# Altium PCB PCB.PcbDoc (part 8 of 8)
Units mm, origin at the board's own origin, x right, y up, seen from the top; angles counter-clockwise.
Board outline 78.8 x 69 mm, 12 copper layers (Top Layer, GND_12, uStrip1, GND_35, Clocks, GND_57, POWER, Slow_Ctrl, GND_810, uStrip2, GND_1012, Bottom Layer), stack 2.926 mm thick; 460 components, 314 nets, 1929 pads, 3409 vias.
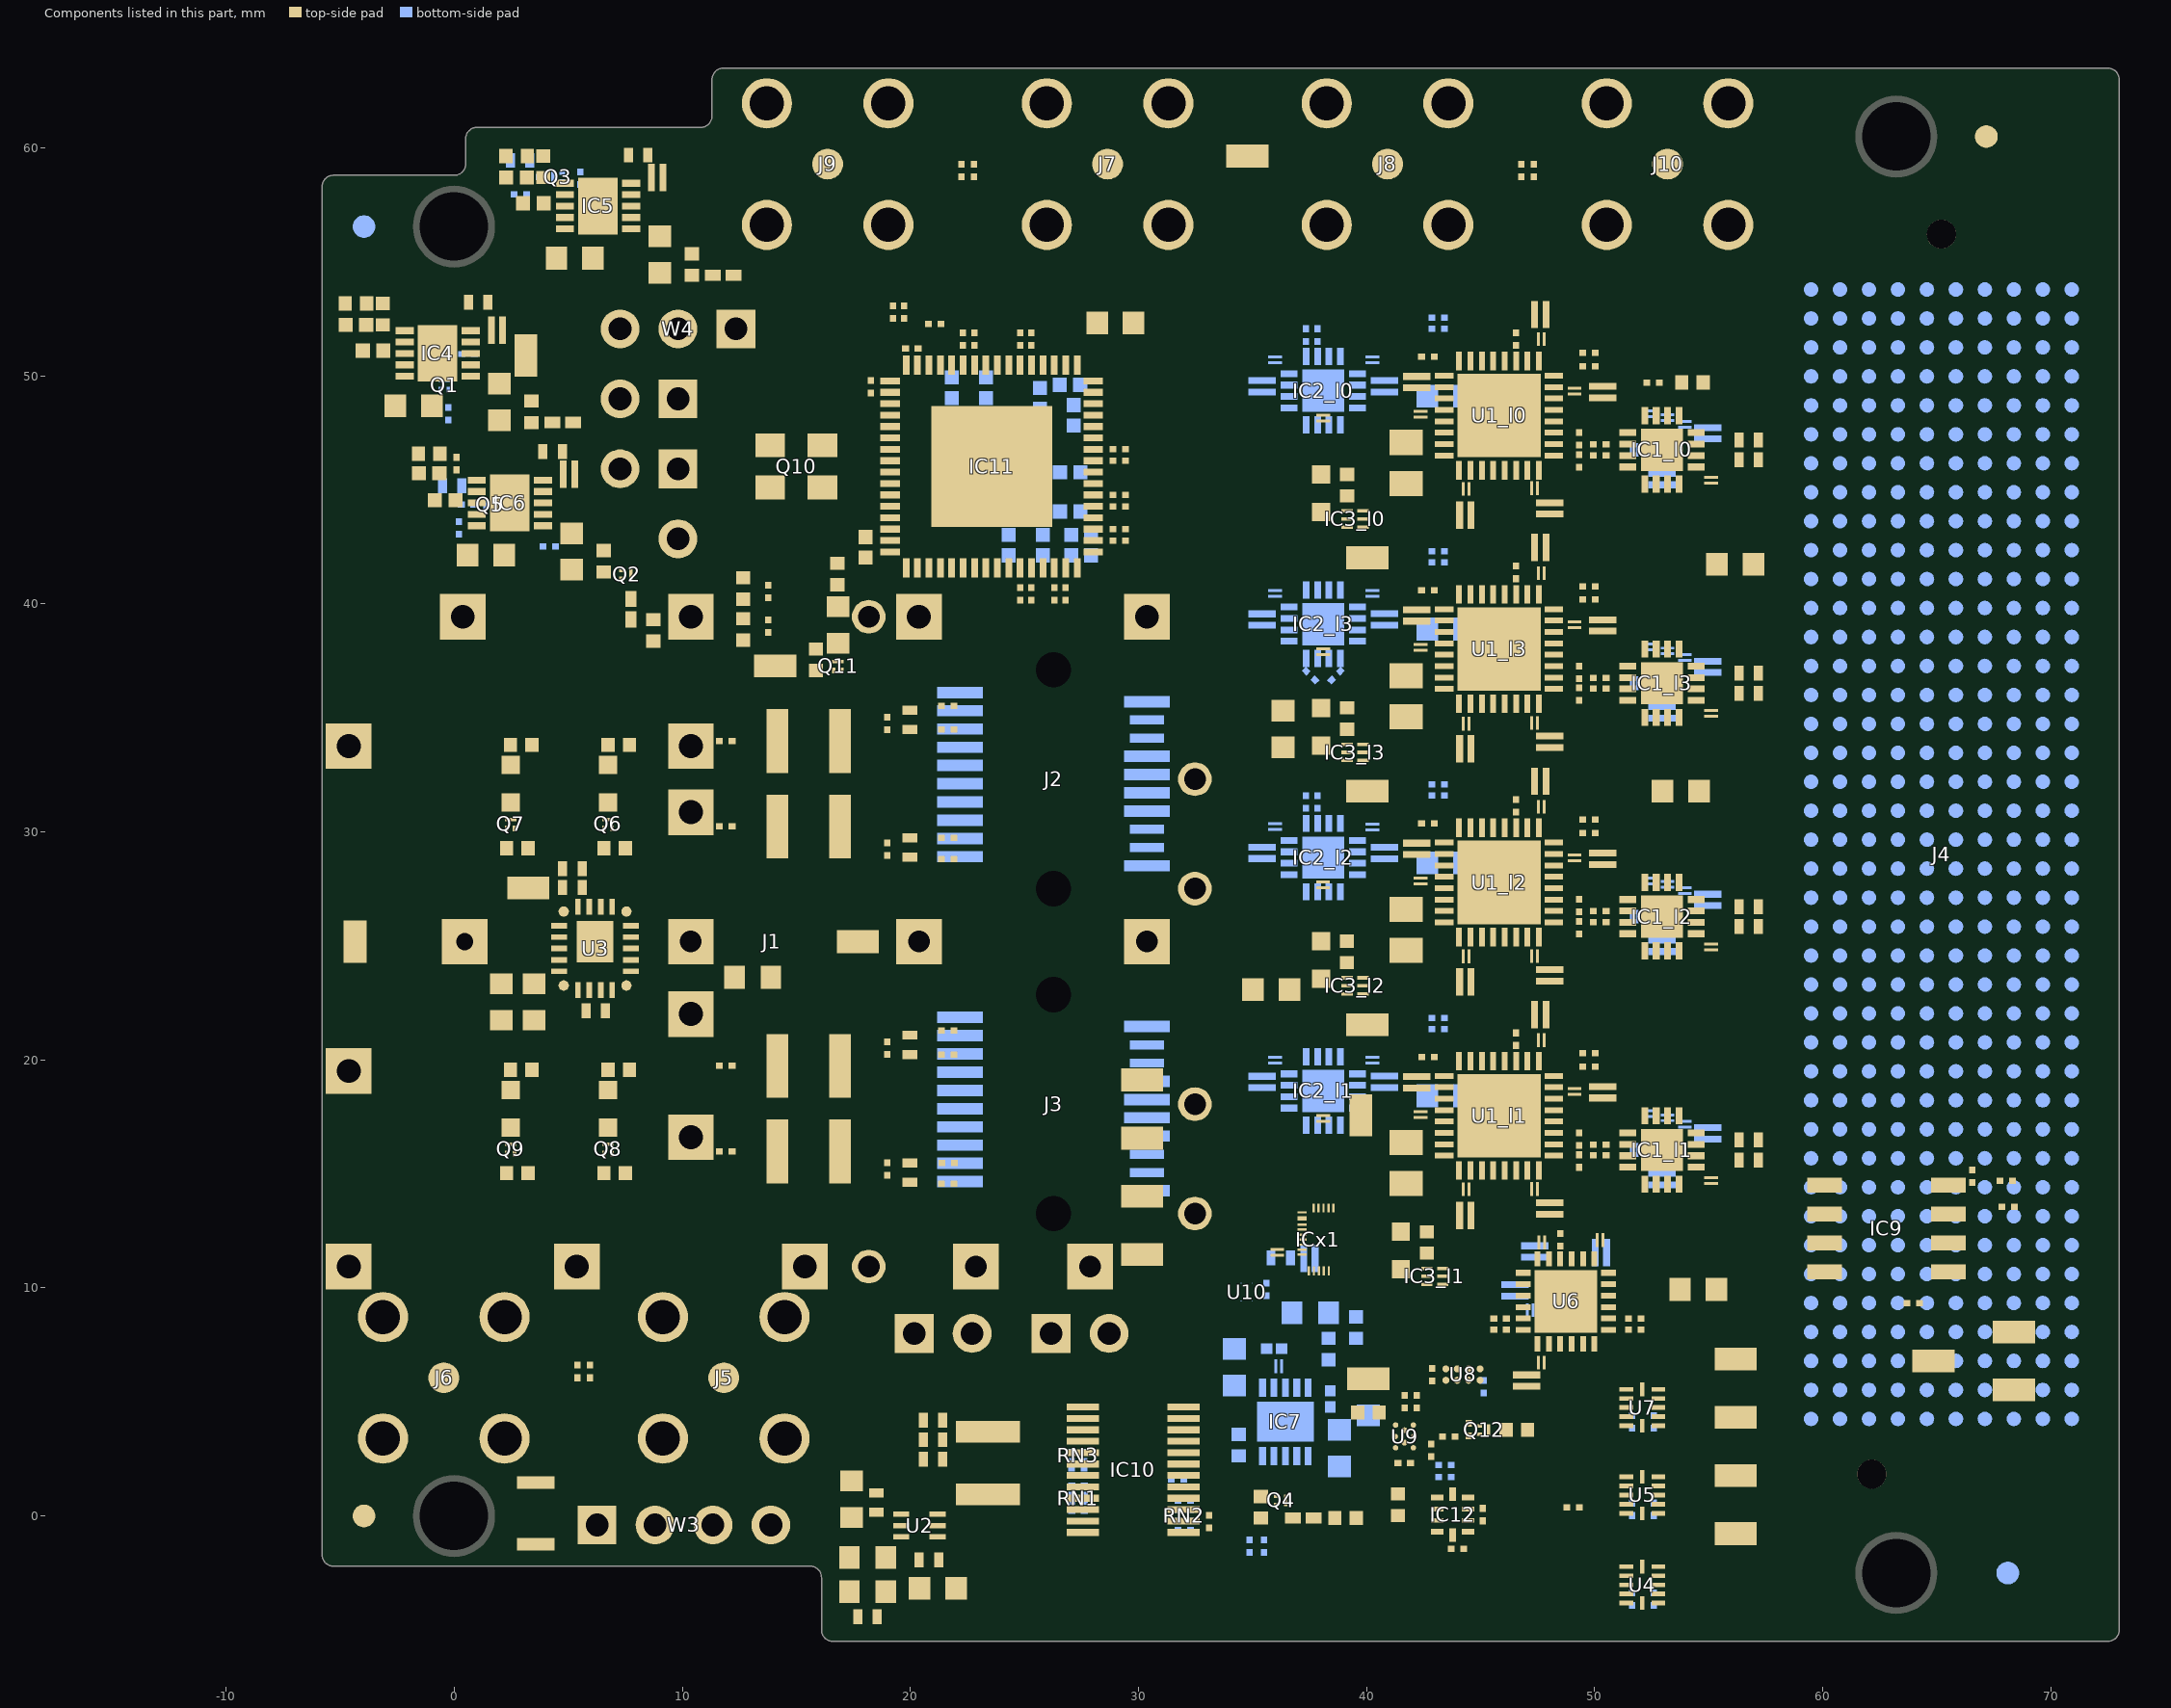
[diagram p17: the components of this part, seen from the top]

## Polygon pours and split planes (outlines as drawn) (continued)
GND on GND_810 (split plane): -5.338,58.8 -5.398,58.794 -5.457,58.776 -5.399,58.8
GND on GND_810 (split plane): 0.191,58.839 0.111,58.815 0.265,58.879
GND on GND_810 (split plane): 0.353,58.947 0.288,58.894 0.406,59.012
GND on GND_810 (split plane): 0.461,59.109 0.421,59.035 0.485,59.189
GND on GND_810 (split plane): 0.506,60.498 0.5,60.438 0.5,60.499 0.524,60.557
GND on GND_810 (split plane): 0.581,60.68 0.552,60.626 0.576,60.683 0.62,60.727
GND on GND_810 (split plane): 0.72,60.819 0.673,60.78 0.717,60.824 0.774,60.848
GND on GND_810 (split plane): 0.902,60.894 0.843,60.876 0.901,60.9 0.962,60.9
GND on GND_810 (split plane): 10.991,60.939 10.911,60.915 11.065,60.979
GND on GND_810 (split plane): 11.153,61.047 11.088,60.994 11.206,61.112
GND on GND_810 (split plane): 11.261,61.209 11.221,61.135 11.285,61.289
GND on GND_810 (split plane): 16.181,-5.28 16.22,-5.327 16.176,-5.283 16.152,-5.226
GND on GND_810 (split plane): 16.32,-5.419 16.374,-5.448 16.317,-5.424 16.273,-5.38
GND on GND_810 (split plane): 16.061,-2.509 16.085,-2.589 16.021,-2.435
GND on GND_810 (split plane): 16.106,-5.098 16.124,-5.157 16.1,-5.099 16.1,-5.038
GND on GND_810 (split plane): 16.502,-5.494 16.562,-5.5 16.501,-5.5 16.443,-5.476
GND on GND_810 (split plane): 72.599,-5.5 72.538,-5.5 72.598,-5.494 72.657,-5.476
GND on GND_810 (split plane): 72.783,-5.424 72.726,-5.448 72.78,-5.419 72.827,-5.38
GND on GND_810 (split plane): 72.924,-5.283 72.88,-5.327 72.919,-5.28 72.948,-5.226
GND on GND_810 (split plane): 73,-5.099 72.976,-5.157 72.994,-5.098 73,-5.038
GND on GND_810 (split plane): 11.306,63.098 11.3,63.038 11.3,63.099 11.324,63.157
GND on GND_810 (split plane): 15.791,-2.239 15.865,-2.279 15.711,-2.215
GND on GND_810 (split plane): 11.381,63.28 11.352,63.226 11.376,63.283 11.42,63.327
GND on GND_810 (split plane): 11.52,63.419 11.473,63.38 11.517,63.424 11.574,63.448
GND on GND_810 (split plane): 11.702,63.494 11.643,63.476 11.701,63.5 11.762,63.5
GND on GND_810 (split plane): 15.953,-2.347 16.006,-2.412 15.888,-2.294
GND on GND_810 (split plane): 73,63.099 73,63.038 72.994,63.098 72.976,63.157
GND on GND_810 (split plane): 72.657,63.476 72.598,63.494 72.538,63.5 72.599,63.5
GND on GND_810 (split plane): 72.924,63.283 72.948,63.226 72.919,63.28 72.88,63.327
GND on GND_810 (split plane): 72.783,63.424 72.827,63.38 72.78,63.419 72.726,63.448
GND on GND_1012 (split plane): -5.794,-1.798 -5.776,-1.857 -5.8,-1.799 -5.8,-1.738
GND on GND_1012 (split plane): -5.719,-1.98 -5.68,-2.027 -5.724,-1.983 -5.748,-1.926
GND on GND_1012 (split plane): -5.794,58.398 -5.8,58.338 -5.8,58.399 -5.776,58.457
GND on GND_1012 (split plane): -5.719,58.58 -5.748,58.526 -5.724,58.583 -5.68,58.627
GND on GND_1012 (split plane): -5.58,-2.119 -5.526,-2.148 -5.583,-2.124 -5.627,-2.08
GND on GND_1012 (split plane): -5.398,-2.194 -5.338,-2.2 -5.399,-2.2 -5.457,-2.176
GND on GND_1012 (split plane): 143 vertices, not listed, extent -5.799,-5.499 72.999,63.499
GND on GND_1012 (split plane): -5.58,58.719 -5.627,58.68 -5.583,58.724 -5.526,58.748
GND on GND_1012 (split plane): -5.338,58.8 -5.398,58.794 -5.457,58.776 -5.399,58.8
GND on GND_1012 (split plane): 0.191,58.839 0.111,58.815 0.265,58.879
GND on GND_1012 (split plane): 0.353,58.947 0.288,58.894 0.406,59.012
GND on GND_1012 (split plane): 0.461,59.109 0.421,59.035 0.485,59.189
GND on GND_1012 (split plane): 0.506,60.498 0.5,60.438 0.5,60.499 0.524,60.557
GND on GND_1012 (split plane): 0.581,60.68 0.552,60.626 0.576,60.683 0.62,60.727
GND on GND_1012 (split plane): 0.72,60.819 0.673,60.78 0.717,60.824 0.774,60.848
GND on GND_1012 (split plane): 0.902,60.894 0.843,60.876 0.901,60.9 0.962,60.9
GND on GND_1012 (split plane): 10.991,60.939 10.911,60.915 11.065,60.979
GND on GND_1012 (split plane): 11.153,61.047 11.088,60.994 11.206,61.112
GND on GND_1012 (split plane): 11.261,61.209 11.221,61.135 11.285,61.289
GND on GND_1012 (split plane): 16.181,-5.28 16.22,-5.327 16.176,-5.283 16.152,-5.226
GND on GND_1012 (split plane): 16.32,-5.419 16.374,-5.448 16.317,-5.424 16.273,-5.38
GND on GND_1012 (split plane): 16.061,-2.509 16.085,-2.589 16.021,-2.435
GND on GND_1012 (split plane): 16.106,-5.098 16.124,-5.157 16.1,-5.099 16.1,-5.038
GND on GND_1012 (split plane): 16.502,-5.494 16.562,-5.5 16.501,-5.5 16.443,-5.476
GND on GND_1012 (split plane): 72.599,-5.5 72.538,-5.5 72.598,-5.494 72.657,-5.476
GND on GND_1012 (split plane): 72.783,-5.424 72.726,-5.448 72.78,-5.419 72.827,-5.38
GND on GND_1012 (split plane): 72.924,-5.283 72.88,-5.327 72.919,-5.28 72.948,-5.226
GND on GND_1012 (split plane): 73,-5.099 72.976,-5.157 72.994,-5.098 73,-5.038
GND on GND_1012 (split plane): 11.306,63.098 11.3,63.038 11.3,63.099 11.324,63.157
GND on GND_1012 (split plane): 15.791,-2.239 15.865,-2.279 15.711,-2.215
GND on GND_1012 (split plane): 11.381,63.28 11.352,63.226 11.376,63.283 11.42,63.327
GND on GND_1012 (split plane): 11.52,63.419 11.473,63.38 11.517,63.424 11.574,63.448
GND on GND_1012 (split plane): 11.702,63.494 11.643,63.476 11.701,63.5 11.762,63.5
GND on GND_1012 (split plane): 15.953,-2.347 16.006,-2.412 15.888,-2.294
GND on GND_1012 (split plane): 73,63.099 73,63.038 72.994,63.098 72.976,63.157
GND on GND_1012 (split plane): 72.657,63.476 72.598,63.494 72.538,63.5 72.599,63.5
GND on GND_1012 (split plane): 72.924,63.283 72.948,63.226 72.919,63.28 72.88,63.327
GND on GND_1012 (split plane): 72.783,63.424 72.827,63.38 72.78,63.419 72.726,63.448

## Keep-outs
Keep-Out Layer:
  lines w0.254: 73.127,-5.001 cw(c72.5,-5) 72.5,-5.627 16.6,-5.627 ; 73.127,-5 73.127,63 ccw(c72.5,63) 73.127,63.001 ccw(c72.5,63) 72.501,63.627 ; -5.927,-1.7 ccw(c-5.3,-1.7) -5.3,-2.327 ; -5.927,-1.7 -5.927,58.3 ; -5.927,-1.7 -5.927,-1.7 ; -5.927,-1.7 -5.927,-1.7 ; -5.927,58.3 cw(c-5.3,58.3) -5.301,58.927 ; -5.927,58.3 -5.927,58.3 ; -5.301,58.927 cw(c-5.3,58.8) -5.3,58.927 ; -5.301,58.927 cw(c-5.3,58.3) -5.3,58.927 ; -5.3,-2.327 14.7,-2.327 15.599,-2.327 ; -5.3,-2.327 -5.3,-2.327 ; -5.3,-2.327 -5.3,-2.327 ; -5.3,58.927 -2,58.927 -0.5,58.927 0,58.927 ; 0,58.927 ccw(c0,59.3) 0.373,59.3 ; 0,58.927 ccw(c0,59.3) 0,58.927 ; 0,58.927 ccw(c0,58.8) 0,58.927 ; 0,58.927 ccw(c0,58.8) 0,58.927 ; 0,58.927 0,58.927 ; 0.373,59.3 cw(c0.5,59.3) 0.373,59.301 ; 0.373,59.3 ccw(c0,59.3) 0.373,59.3 ; 0.373,59.3 0.373,59.301 ; 0.373,59.301 0.373,60.4 ; 0.373,60.4 cw(c1,60.4) 0.999,61.027 ; 0.373,60.4 0.373,60.4 ; 1,61.027 ccw(c1,60.9) 1,61.027 ; 1,61.027 ccw(c1,60.9) 0.999,61.027 ; 1,61.027 ccw(c1,60.4) 0.999,61.027 ; 1,61.027 8,61.027 10.4,61.027 10.8,61.027 ; 10.8,61.027 ccw(c10.8,61.4) 11.173,61.4 ; 10.8,61.027 ccw(c10.8,61.4) 10.8,61.027 ; 10.8,61.027 ccw(c10.8,60.9) 10.8,61.027 ; 10.8,61.027 ccw(c10.8,60.9) 10.8,61.027 ; 10.8,61.027 10.8,61.027 ; 11.173,61.401 ccw(c11.3,61.4) 11.173,61.4 ; 11.173,61.4 ccw(c10.8,61.4) 11.173,61.4 ; 11.173,61.401 11.173,63 cw(c11.8,63) 11.799,63.627 ; 11.173,61.4 11.173,61.401 ; 11.8,63.627 ccw(c11.8,63.5) 11.8,63.627 ; 11.8,63.627 ccw(c11.8,63.5) 11.799,63.627 ; 11.8,63.627 ccw(c11.8,63) 11.799,63.627 ; 11.8,63.627 72.5,63.627 ; 15.599,-2.327 ccw(c15.6,-2.2) 15.6,-2.327 ; 15.599,-2.327 15.6,-2.327 ; 15.6,-2.327 cw(c15.6,-2.7) 15.973,-2.7 ; 15.973,-2.701 cw(c16.1,-2.7) 15.973,-2.7 ; 15.973,-2.701 15.973,-2.7 ; 15.973,-2.701 15.973,-5 ccw(c16.6,-5) 16.6,-5.627 ; 15.973,-2.7 ccw(c15.6,-2.7) 15.973,-2.7 ; 16.6,-5.627 ccw(c16.6,-5.5) 16.6,-5.627 ; 16.6,-5.627 ccw(c16.6,-5.5) 16.6,-5.627 ; 16.6,-5.627 ccw(c16.6,-5.5) 16.6,-5.627 ; 16.6,-5.627 ccw(c16.6,-5.5) 16.6,-5.627 ; 16.6,-5.627 16.6,-5.627 ; 16.6,-5.627 16.6,-5.627 ; 72.501,63.627 ccw(c72.5,63) 72.5,63.627

## Other copper
Top Layer:
  rectangle net VREFAC: 52.668,49.402 54.074,50.022
  rectangle net GND: 38.294,10.557 38.56,11.157
  region net GND: 37.721,13.707 37.472,13.707 37.472,13.205 37.721,13.205
  rectangle net GND: 38.497,13.205 38.763,13.707
  region net NetC143_2: 50.179,12.399 49.729,12.399 49.729,11.695 50.179,11.695
  rectangle net 1VPSF: 35.776,9.929 37.287,11.516
  region net NetC31_l1_2: 37.859,17.373 37.859,16.829 38.359,16.829 38.359,17.373
  region net NetC31_l2_2: 37.85,27.61 37.85,27.066 38.35,27.066 38.35,27.61
  region net NetC31_l3_2: 37.859,37.846 37.859,37.302 38.359,37.302 38.359,37.846
  region net NetC31_l0_2: 37.859,48.081 37.859,47.538 38.359,47.538 38.359,48.081
  region net 3V3CDR: 50.981,12.399 50.306,12.399 50.306,11.248 50.981,11.248
  region net 3V3CDR: 47.205,9.792 46.545,9.792 46.545,9.038 47.205,9.038
  rectangle net XTAL_GND: 18.333,46.78 18.582,47.032
  pour cut-out: 63.132,14.041 63.109,14.168 64.324,14.168 64.301,14.041
  pour cut-out: 2.97,29.699 2.398,29.699 2.431,29.572 2.943,29.572
  pour cut-out: 3.145,34.231 2.573,34.231 2.606,34.104 3.118,34.104
  pour cut-out: 7.417,34.231 6.845,34.231 6.879,34.104 7.391,34.104
  pour cut-out: 15.546,36.936 14.974,36.936 15.007,36.809 15.519,36.809
  pour cut-out: 12.18,52.09 12.18,51.775 12.307,51.809 12.307,52.063
  pour cut-out: 8.249,59.566 7.935,59.566 7.968,59.439 8.222,59.439
  pour cut-out: 3.277,58.292 3.277,57.977 3.404,58.011 3.404,58.265
  pour cut-out: 1.229,53.116 0.915,53.116 0.949,52.989 1.203,52.989
  pour cut-out: -3.755,51.83 -3.755,51.515 -3.628,51.549 -3.628,51.803
  pour cut-out: -0.59,45.273 -0.59,44.959 -0.463,44.993 -0.463,45.247
  pour cut-out: 4.481,46.607 4.167,46.607 4.2,46.48 4.454,46.48
  pour cut-out: 8.313,39.071 8.313,38.757 8.44,38.791 8.44,39.045
  pour cut-out: 14.225,39.622 14.225,39.937 14.098,39.903 14.098,39.649
  pour cut-out: 39.199,5.181 39.072,5.158 39.072,5.458 39.199,5.435
  pour cut-out: 68.082,12.619 68.209,12.642 68.209,12.172 68.082,12.195
  pour cut-out: 64.766,11.007 64.639,10.984 64.639,11.284 64.766,11.261
  pour cut-out: 50.972,-4.572 50.845,-4.595 50.845,-4.295 50.972,-4.318
  pour cut-out: 53.231,2.748 53.254,2.621 52.713,2.621 52.736,2.748
  pour cut-out: 54.351,-0.552 54.374,-0.679 54.074,-0.679 54.097,-0.552
  pour cut-out: 53.692,-1.941 53.669,-1.814 55.993,-1.814 55.97,-1.941
  pour cut-out: 50.229,2.126 50.206,2.253 50.506,2.253 50.483,2.126
  pour cut-out: 49.482,-1.793 49.459,-1.666 49.759,-1.666 49.736,-1.793
  pour cut-out: 42.202,2.248 42.075,2.162 42.075,2.462 42.202,2.375
  region net NetC37_2: 0.318,51.337 1.771,51.337 1.771,53.55 1.271,53.55 1.271,52.9 1.471,52.9 1.471,51.637 0.318,51.637
  pour cut-out: 38.508,44.399 38.485,44.526 38.785,44.526 38.762,44.399
  pour cut-out: 38.508,34.162 38.485,34.289 38.785,34.289 38.762,34.162
  pour cut-out: 38.505,23.926 38.482,24.053 38.782,24.053 38.759,23.926
  pour cut-out: 41.627,11.341 41.65,11.214 41.35,11.214 41.373,11.341
  pour cut-out: 41.373,10.287 41.35,10.414 41.65,10.414 41.627,10.287
  pour cut-out: 36.185,34.186 36.499,34.186 36.465,34.313 36.211,34.313
  pour cut-out: 36.495,33.236 36.181,33.236 36.215,33.109 36.469,33.109
  pour cut-out: 36.139,22.938 36.139,23.252 36.012,23.218 36.012,22.964
  pour cut-out: 37.089,23.249 37.089,22.934 37.216,22.968 37.216,23.222
  pour cut-out: 54.868,9.783 54.868,10.097 54.741,10.063 54.741,9.809
  pour cut-out: 55.818,10.094 55.818,9.779 55.945,9.813 55.945,10.067
  pour cut-out: 54.093,31.633 54.093,31.947 53.966,31.913 53.966,31.659
  pour cut-out: 55.043,31.943 55.043,31.629 55.17,31.663 55.17,31.917
  pour cut-out: 56.492,41.587 56.492,41.902 56.365,41.868 56.365,41.614
  pour cut-out: 57.442,41.898 57.442,41.584 57.569,41.618 57.569,41.872
  pour cut-out: 30.258,52.482 30.258,52.167 30.385,52.201 30.385,52.455
  pour cut-out: 29.308,52.171 29.308,52.485 29.181,52.452 29.181,52.198
  pour cut-out: 18.345,-2.429 18.345,-2.787 18.756,-2.826 18.756,-2.445
  pour cut-out: 18.345,-3.07 18.345,-1.305 17.924,-1.409 17.924,-3.001
  region net P3V6: 18.347,-4.097 18.472,-2.826 19.372,-2.826 19.372,-3.826 18.747,-4.747 18.347,-4.747
  region net NetC48_1: 19.95,-0.805 19.239,-0.805 16.872,-0.805 16.872,-1.325 16.872,-3.826 17.497,-4.747 17.897,-4.747 17.897,-4.097 17.772,-3.826 17.772,-2.325 17.772,-1.325 19.239,-1.034 19.95,-1.034
  pour cut-out: 41.041,23.426 40.914,23.403 40.914,24.144 41.041,24.121
  pour cut-out: 41.037,33.722 40.91,33.699 40.91,34.441 41.037,34.418
  pour cut-out: 41.037,43.914 40.91,43.891 40.91,44.633 41.037,44.61
  pour cut-out: 42.356,11.701 42.229,11.678 42.229,12.157 42.356,12.134
  pour cut-out: 41.036,25.426 40.909,25.403 40.909,25.883 41.036,25.86
  pour cut-out: 41.036,35.663 40.909,35.64 40.909,36.119 41.036,36.096
  pour cut-out: 43.227,14.051 43.25,13.924 42.533,13.924 42.556,14.051
  pour cut-out: 41.036,15.323 40.909,15.3 40.909,15.6 41.036,15.577
  pour cut-out: 41.036,45.959 40.909,45.936 40.909,46.416 41.036,46.393
  pour cut-out: 42.768,19.825 42.895,19.848 42.895,19.548 42.768,19.571
  pour cut-out: 40.288,4.251 40.311,4.124 40.011,4.124 40.034,4.251
  pour cut-out: 42.708,2.328 42.685,2.455 42.985,2.455 42.962,2.328
  pour cut-out: 46.297,21.302 46.424,21.325 46.424,21.025 46.297,21.048
  pour cut-out: 42.147,20.247 42.274,20.27 42.274,19.97 42.147,19.993
  pour cut-out: 42.551,20.384 42.574,20.257 42.274,20.257 42.297,20.384
  pour cut-out: 46.285,31.551 46.412,31.574 46.412,31.274 46.285,31.297
  pour cut-out: 42.135,30.496 42.262,30.519 42.262,30.219 42.135,30.242
  pour cut-out: 42.539,30.633 42.562,30.506 42.262,30.506 42.285,30.633
  pour cut-out: 46.285,41.787 46.412,41.81 46.412,41.51 46.285,41.533
  pour cut-out: 42.135,40.732 42.262,40.755 42.262,40.455 42.135,40.478
  pour cut-out: 42.539,40.869 42.562,40.742 42.262,40.742 42.285,40.869
  pour cut-out: 42.539,51.106 42.562,50.979 42.262,50.979 42.285,51.106
  pour cut-out: 42.135,50.968 42.262,50.991 42.262,50.691 42.135,50.714
  pour cut-out: 46.285,52.023 46.412,52.046 46.412,51.746 46.285,51.769
  pour cut-out: 37.476,44.155 37.603,44.178 37.603,43.878 37.476,43.901
  pour cut-out: 37.476,33.919 37.603,33.942 37.603,33.642 37.476,33.665
  pour cut-out: 37.473,23.682 37.6,23.705 37.6,23.405 37.473,23.428
  pour cut-out: 40.973,10.941 41.1,10.964 41.1,10.664 40.973,10.687
  pour cut-out: 18.934,0.435 18.934,0.793 18.743,0.536
  pour cut-out: 20.975,-2.619 20.975,-2.261 20.554,-2.364 20.554,-2.549
  region net NetR71_1: 12.168,38.163 12.665,38.163 12.665,38.663 12.168,38.663
  region net NetR70_1: 12.168,40.903 12.665,40.903 12.665,41.403 12.168,41.403
  region net VccT0: 7.93,32.723 7.93,33.903 7.43,33.903 7.43,32.723
  region net SFP0_FAULT: 7.255,29.785 7.255,29.204 7.755,29.204 7.755,29.785
  region net VccR0: 3.657,33.322 3.657,33.903 3.157,33.903 3.157,33.322
  region net SFP0_LOS: 2.982,29.785 2.982,29.204 3.482,29.204 3.482,29.785
  region net 3V3APLL: 18.432,43.348 18.714,43.63 19.533,43.63 19.533,43.93 18.218,43.93 17.722,43.434 17.722,42.62 18.432,42.62
  region net CDR_LOL_0: 43.497,46.266 43.497,46.636 42.997,46.636 42.997,46.266
  region net NetC49_2: 2.847,59.012 4.227,59.012 4.227,58.392 4.492,58.099 5.251,58.099 5.251,57.799 4.451,57.799 3.917,58.392 2.847,58.392
  region net NetC59_2: 3.484,44.78 4.936,44.78 4.936,46.994 4.625,46.994 4.625,45.08 3.484,45.08
  region net CDR_LOL_1: 43.497,15.557 43.497,15.927 42.997,15.927 42.997,15.557
  region net CDR_LOL_3: 43.497,36.03 43.497,36.4 42.997,36.4 42.997,36.03
  region net CDR_LOL_2: 43.497,25.793 43.497,26.163 42.997,26.163 42.997,25.793
  region net NetC36_2: -4.186,52.55 -2.806,52.55 -2.806,51.93 -2.54,51.637 -1.782,51.637 -1.782,51.337 -2.582,51.337 -3.116,51.93 -4.186,51.93
  region net NetC58_2: -0.962,46.074 0.36,46.074 0.36,45.374 0.625,45.08 1.384,45.08 1.384,44.78 0.584,44.78 0.05,45.374 -0.962,45.374
  region net NetC41_2: 19.95,-0.034 18.182,-0.034 18.182,0.365 19.241,0.365 19.95,0.195
  region net 3V3CDR_EN: 7.501,58.845 7.501,58.299 8.001,58.299 8.001,58.845
  region net PLL_Lock: 15.362,37.771 15.86,37.771 15.86,38.271 15.362,38.271
  region net XTAL_GND: 18.433,44.88 18.183,45.13 18.483,45.43 19.533,45.43 19.533,45.13 18.683,45.13
  region net XTAL_GND: 18.433,47.18 18.183,46.93 18.483,46.63 19.533,46.63 19.533,46.93 18.683,46.93
  region net NetC50_2: 7.338,57.799 8.79,57.799 8.79,60.012 8.29,60.012 8.29,59.362 8.49,59.362 8.49,58.099 7.338,58.099
  region net VccT1: 7.93,18.473 7.93,19.653 7.43,19.653 7.43,18.473
  region net VccR1: 3.657,19.072 3.657,19.653 3.157,19.653 3.157,19.072
  region net SFP1_LOS: 2.982,15.535 2.982,14.954 3.482,14.954 3.482,15.535
  region net SFP1_FAULT: 7.255,15.535 7.255,14.954 7.755,14.954 7.755,15.535
  region net NetIC5_6: 2.867,59.952 4.451,59.952 5.251,59.332 5.251,58.299 4.451,58.299 4.451,59.332 2.867,59.332
  region net P3V6: 5.251,57.099 5.251,55.799 4.317,55.799 4.317,57.099
  region net NetIC6_6: -1,46.934 0.584,46.934 1.384,46.314 1.384,45.28 0.584,45.28 0.584,46.234 -1,46.234
  region net 1V8_EN: 3.634,45.827 3.634,45.28 4.134,45.28 4.134,45.827
  region net P2V05: 1.384,44.08 1.384,42.78 0.45,42.78 0.45,44.08
  region net P3V6: -1.782,50.637 -1.782,49.337 -2.715,49.337 -2.715,50.637
  region net 3V3APLL_EN: 0.468,52.383 0.468,51.837 0.968,51.837 0.968,52.383
  region net NetIC4_6: -4.166,53.49 -2.582,53.49 -1.782,52.87 -1.782,51.837 -2.582,51.837 -2.582,52.87 -4.166,52.87
uStrip1:
  pour cut-out: -0.461,5.062 cw(c-0.461,6.062) -1.461,6.062 cw(c-0.461,6.062) -0.461,7.062 cw(c-0.461,6.062) 0.539,6.062 cw(c-0.461,6.062)
  pour cut-out: 11.814,5.062 cw(c11.814,6.062) 10.814,6.062 cw(c11.814,6.062) 11.814,7.062 cw(c11.814,6.062) 12.814,6.062 cw(c11.814,6.062)
  pour cut-out: 16.37,58.289 cw(c16.37,59.289) 15.37,59.289 cw(c16.37,59.289) 16.37,60.289 cw(c16.37,59.289) 17.37,59.289 cw(c16.37,59.289)
  pour cut-out: 28.645,58.289 cw(c28.645,59.289) 27.645,59.289 cw(c28.645,59.289) 28.645,60.289 cw(c28.645,59.289) 29.645,59.289 cw(c28.645,59.289)
  pour cut-out: 40.92,58.289 cw(c40.92,59.289) 39.92,59.289 cw(c40.92,59.289) 40.92,60.289 cw(c40.92,59.289) 41.92,59.289 cw(c40.92,59.289)
  pour cut-out: 53.195,58.289 cw(c53.195,59.289) 52.195,59.289 cw(c53.195,59.289) 53.195,60.289 cw(c53.195,59.289) 54.195,59.289 cw(c53.195,59.289)
  pour cut-out: 42.79,5.454 42.79,4.455 44.673,4.455
  pour cut-out: 43.543,3.22 42.862,3.22 42.63,2.064
  pour cut-out: 48.067,5.405 48.067,6.086 47.573,6.086
  pour cut-out: 31.451,10.616 31.428,10.743 32.023,10.743 32,10.616
  pour cut-out: 20.296,47.123 18.546,48.872 12.614,48.872 11.673,47.931 11.673,43.869 13.094,42.454 18.09,42.454 20.296,44.66
  pour cut-out: 20.296,47.123 18.546,48.872 12.614,48.872 11.673,47.931 11.673,43.869 13.094,42.454 18.09,42.454 20.296,44.66
Clocks:
  pour cut-out: 31.958,10.334 31.433,10.39 31.433,10.61
  pour cut-out: 28.277,3.057 27.876,3.057 27.876,3.277
  pour cut-out: 34.105,14.879 35.024,10.598 38.914,12.813
  pour cut-out: 20.296,47.123 18.546,48.872 12.614,48.872 11.673,47.931 11.673,43.869 13.094,42.454 18.09,42.454 20.296,44.66
Slow_Ctrl:
  pour cut-out: 29.829,6.469 27.89,6.469 27.89,6.172 29.829,6.172
  pour cut-out: 22.245,12.746 21.161,12.746 21.161,14.074
  pour cut-out: 23.233,16.434 22.533,16.434 22.533,17.291
  pour cut-out: 7.359,15.834 7.359,16.322 7.957,16.322
  pour cut-out: 20.9,18.125 20.9,17.637 20.302,17.637
  pour cut-out: 65.884,20.176 65.884,18.52 66.181,18.52 66.181,20.176
  pour cut-out: 27.54,7.62 27.54,7.131 26.942,7.131
  pour cut-out: 1.005,37.565 1.493,37.565 1.493,36.666
  pour cut-out: 4.113,41.69 4.113,42.178 5.012,42.178
  pour cut-out: 6.766,30.52 7.255,30.52 7.255,29.921
  pour cut-out: 32.092,10.886 31.553,10.886 31.553,10.589 32.092,10.589
  pour cut-out: 63.696,43.56 64.236,43.56 64.236,43.857 63.696,43.857
  pour cut-out: 66.962,40.71 66.962,40.171 67.259,40.171 67.259,40.71
  pour cut-out: 20.296,47.123 18.546,48.872 12.614,48.872 11.673,47.931 11.673,43.869 13.094,42.454 18.09,42.454 20.296,44.66
uStrip2:
  pour cut-out: 67.902,28.908 67.902,27.962 67.362,27.962
  pour cut-out: 62.407,26.838 63.353,26.838 63.353,24.924
  pour cut-out: 55.276,-2.122 53.442,-2.122 53.442,-1.582
  pour cut-out: 24.297,31.138 24.297,32.084 24.837,32.084
  pour cut-out: 50.709,8.942 51.655,8.942 51.655,8.401
  pour cut-out: 17.217,3.93 17.217,4.876 17.758,4.876
  pour cut-out: 42.691,6.494 42.691,7.44 43.231,7.44
  pour cut-out: 24.275,8.935 25.221,8.935 25.221,8.395
  pour cut-out: 57.749,9.982 58.695,9.982 58.695,9.442
  pour cut-out: 59.307,9.906 58.361,9.906 58.361,10.446
  pour cut-out: 64.104,10.178 65.05,10.178 65.05,9.638
  pour cut-out: 63.829,8.789 64.776,8.789 64.776,8.249
  pour cut-out: 59.591,21.356 58.992,21.424 71.375,21.424 71.375,18.927
  pour cut-out: 64.245,22.386 66.328,22.386 66.328,21.197
  pour cut-out: 68.457,28.653 69.403,28.653 69.403,28.112
  pour cut-out: 71.276,33.733 72.222,33.733 72.222,33.193
  pour cut-out: 71.188,33.325 71.188,32.379 70.648,32.379
  pour cut-out: 64.794,26.668 64.794,27.614 65.335,27.614
  pour cut-out: 63.233,23.529 64.179,23.529 64.179,22.988
  pour cut-out: 63.61,28.27 63.61,27.324 63.07,27.324
  pour cut-out: 52.54,4.839 55.875,4.839 55.875,-2.716
  pour cut-out: 36.202,30.727 37.321,30.559 37.148,30.186
  pour cut-out: 44.427,24.972 45.245,24.972 45.245,24.432
  pour cut-out: 20.372,47.288 18.623,49.037 12.69,49.037 11.749,48.096 11.749,44.034 13.171,42.619 18.166,42.619 20.372,44.825
Bottom Layer:
  rectangle net 3V3CDR: 41.577,17.842 43.145,18.928
  rectangle net 3V3CDR: 41.577,28.064 43.145,29.149
  rectangle net 3V3CDR: 41.577,38.314 43.145,39.399
  rectangle net GND: 38.633,3.301 39.85,4.25
  rectangle net GND: 38.408,4.112 38.633,5.038
  rectangle net 3V3CDR: 41.577,48.523 43.145,49.609
  region net 3V3CDR: 47.118,9.789 45.911,9.789 45.911,8.728 47.118,8.728
  pour cut-out: 6.045,59.57 6.045,59.259 5.809,59.259
  pour cut-out: 56.638,14.342 58.057,14.342 58.057,13.951
  pour cut-out: 26.876,43.434 26.749,43.411 26.749,43.711 26.876,43.688
  region net 3V3_CDR_DIS: 5.38,59.102 5.38,58.8 5.834,58.8 5.834,59.102
  pour cut-out: 31.007,2.515 30.88,2.492 30.88,3.542 31.007,3.519
  pour cut-out: 30.93,1.02 30.803,0.997 30.803,1.297 30.93,1.274
  pour cut-out: 45.331,45.337 45.204,45.314 45.204,46.119 45.331,46.096
  pour cut-out: 34.77,-0.236 34.793,-0.363 33.728,-0.363 33.751,-0.236
  pour cut-out: 39.819,8.467 39.946,8.49 39.946,8.063 39.819,8.086
  pour cut-out: -0.527,48.195 -0.4,48.218 -0.4,47.918 -0.527,47.941
  pour cut-out: 58.117,34.384 58.117,34.25 59.494,34.25
  pour cut-out: 5.39,58.125 5.367,58.252 5.667,58.252 5.644,58.125
  pour cut-out: 2.132,59.58 2.259,59.603 2.259,59.303 2.132,59.326
  pour cut-out: 2.786,59.326 2.659,59.303 2.659,59.603 2.786,59.58
  pour cut-out: 0.75,50.697 0.727,50.824 1.027,50.824 1.004,50.697
  pour cut-out: 1.004,51.225 1.027,51.098 0.727,51.098 0.75,51.225
  pour cut-out: -0.851,45.305 -0.724,45.328 -0.724,45.028 -0.851,45.051
  pour cut-out: 4.723,42.392 4.596,42.369 4.596,42.669 4.723,42.646
  pour cut-out: 34.265,3.157 34.242,3.284 34.542,3.284 34.519,3.157
  pour cut-out: 51.39,-3.316 51.263,-3.339 51.263,-2.234 51.39,-2.257
  pour cut-out: 52.806,-3.619 52.783,-3.492 53.083,-3.492 53.06,-3.619
  pour cut-out: 35.489,12.022 35.616,12.045 35.616,11.745 35.489,11.768
  pour cut-out: 36.098,9.871 36.121,9.744 35.821,9.744 35.844,9.871
  pour cut-out: 35.129,5.259 35.152,5.132 34.852,5.132 34.875,5.259
  pour cut-out: 51.76,4.684 51.783,4.557 51.483,4.557 51.506,4.684
  pour cut-out: 52.711,0.845 52.734,0.718 52.434,0.718 52.457,0.845
  pour cut-out: 51.242,0.718 51.219,0.845 51.519,0.845 51.496,0.718
  region net 1VPSF: 37.391,11.904 36.195,11.904 36.195,9.786 37.391,9.786 37.391,10.704
  pour cut-out: 20.296,47.123 18.546,48.872 12.614,48.872 11.673,47.931 11.673,43.869 13.094,42.454 18.09,42.454 20.296,44.66
GND_12 (plane layer: these items are gaps in the copper):
  region: 53.195,58.289 cw(c53.195,59.289) 52.195,59.289 cw(c53.195,59.289) 53.195,60.289 cw(c53.195,59.289) 54.195,59.289 cw(c53.195,59.289)
  region: 40.92,58.289 cw(c40.92,59.289) 39.92,59.289 cw(c40.92,59.289) 40.92,60.289 cw(c40.92,59.289) 41.92,59.289 cw(c40.92,59.289)
  region: 28.645,58.289 cw(c28.645,59.289) 27.645,59.289 cw(c28.645,59.289) 28.645,60.289 cw(c28.645,59.289) 29.645,59.289 cw(c28.645,59.289)
  region: 16.37,58.289 cw(c16.37,59.289) 15.37,59.289 cw(c16.37,59.289) 16.37,60.289 cw(c16.37,59.289) 17.37,59.289 cw(c16.37,59.289)
  region: 11.814,5.062 cw(c11.814,6.062) 10.814,6.062 cw(c11.814,6.062) 11.814,7.062 cw(c11.814,6.062) 12.814,6.062 cw(c11.814,6.062)
  region: -0.461,5.062 cw(c-0.461,6.062) -1.461,6.062 cw(c-0.461,6.062) -0.461,7.062 cw(c-0.461,6.062) 0.539,6.062 cw(c-0.461,6.062)
  lines w0.762: 11.931,44.118 11.931,47.978 12.667,48.714 18.457,48.714 20.044,47.127 20.044,44.803 18.051,42.81 13.238,42.81 11.931,44.118
POWER (plane layer: these items are gaps in the copper):
  region: 11.673,42.673 17.077,42.673 18.398,43.994 20.296,44.011 20.296,48.832 11.673,48.832
  lines w0.254: -1.959,44.011 1.564,44.011 7.4,35.681 ; -1.956,50.755 -1.959,44.012 -1.959,37.571 1.149,34.95 ; -1.936,50.755 2.085,53.928 3.631,53.928 3.631,60.9 ; 1.145,34.953 1.145,26.552 4.704,26.552 7.4,26.552 7.4,35.681 ; 4.736,26.552 4.736,6.679 24.782,6.679 24.782,0.412 ; 11.673,43.873 11.673,47.931 ; 11.673,48.832 11.673,42.673 16.489,42.673 ; 12.614,48.872 18.546,48.872 ; 19.646,17.865 30.151,17.865 ; 20.296,44.66 20.296,47.123 ; 21.235,-5.5 21.235,0.412 24.8,0.412 27.873,-2.662 56.751,-2.662 61.813,2.4 63.025,3.612 69.013,3.612 69.013,7.643 67.951,7.643 67.951,11.136 69.138,11.136 73,7.274 ; 30.151,32.115 19.646,32.115 ; 33.625,-2.662 33.625,-2.271 33.625,-1.169 34.122,-1.169 34.904,-1.951 55.431,-1.951 63.547,6.165 66.096,6.165 66.096,3.612 ; 43.21,2.292 43.21,3.042 43.21,4.258 41.166,4.258 41.166,7.319 39.911,7.319 37.12,10.109 37.12,11.012 35.989,11.012 ; 43.817,2.292 46.675,2.292 ; 51.001,12.346 51.001,63.3 ; 51.001,12.546 51.001,9.786 47.493,6.279 47.194,6.279 46.439,7.033 46.439,9.923 41.247,17.176 41.247,55.632 9.537,55.632 9.537,60.9 ; 51.001,14.672 51.001,14.115 52.06,14.115 52.06,17.109 53.528,17.109 53.528,18.297 52.912,18.297 52.912,17.673 52.06,17.673 52.06,27.342 53.528,27.342 53.528,28.582 52.912,28.582 52.912,27.923 52.06,27.923 52.06,37.574 53.528,37.574 53.528,38.797 52.912,38.78 52.912,38.155 52.06,38.155 52.06,47.781 54.135,47.781 54.135,50.096 52.912,50.096 52.912,48.31 51.001,48.31 ; 67.743,9.975 60.318,9.975 58.284,7.941 52.635,2.292 41.166,2.292 40.909,2.292 35.989,7.212 35.989,11.012 ; 7.4,35.681 13.262,35.681 13.262,25.821 19.646,19.931 ; 9.537,60.9 ccw(c9.537,60.9) 9.537,60.9 ; 9.537,60.9 ccw(c9.537,60.9) 9.537,60.9 ; 16.1,-2.7 ccw(c16.1,-2.7) 16.1,-2.7 ; 16.1,-2.7 16.1,-2.7 ; 16.489,42.673 17.077,42.673 18.398,43.994 20.296,43.994 20.296,48.832 2.612,48.832 2.612,51.16 20.585,51.16 21.489,51.16 21.489,49.784 22.22,49.054 22.22,41.267 16.489,41.267 16.489,42.673 ; 19.646,19.931 30.151,19.931 30.151,15.799 ; 19.646,19.931 19.646,15.799 30.151,15.799 ; 19.646,32.115 19.638,34.181 30.151,34.181 30.151,30.049 19.646,30.049 19.646,32.115 ; 30.151,15.799 35.989,11.012 ; 72.5,63.5 ccw(c72.5,63.5) 72.5,63.5 ; 72.5,63.5 72.5,63.5 ; 73,7.274 ccw(c73,7.274) 73,7.274 ; 0,58.8 0,58.8 ; 11.3,63 ccw(c11.3,63) 11.3,63 ; 16.6,-5.5 16.6,-5.5 ; 51.001,63.5 ccw(c51.001,63.5) 51.001,63.5 ; 65.838,13.15 65.838,15.69 68.378,15.69 68.378,13.15 65.838,13.15 ; 73,-5 73,-5
  lines w0.508: 0.5,60.4 0.5,59.3 cw(c0,59.3) 0,58.8 -5.3,58.8 ccw(c-5.3,58.3) -5.8,58.3 -5.8,-1.7 ccw(c-5.3,-1.7) -5.3,-2.2 15.6,-2.2 cw(c15.6,-2.7) 16.1,-2.7 16.1,-5 ccw(c16.6,-5) 16.6,-5.5 21.235,-5.5 72.5,-5.5 ccw(c72.5,-5) 73,-5 73,7.274 73,63 ccw(c72.5,63) 72.5,63.5 51.001,63.5 11.8,63.5 ccw(c11.8,63) 11.3,63 11.3,61.4 cw(c10.8,61.4) 10.8,60.9 9.537,60.9 3.631,60.9 1,60.9 ; 0.5,60.45 cw(c0.95,60.45) 0.95,60.9
GND_35 (plane layer: these items are gaps in the copper):
  region: 20.306,47.186 18.557,48.935 12.624,48.935 11.683,47.994 11.683,43.936 13.101,42.517 18.1,42.517 20.306,44.723
  lines w0.254: 11.683,43.936 11.683,47.994 12.624,48.935 18.557,48.935 20.306,47.186 20.306,44.723 18.1,42.517 13.101,42.517 11.683,43.936
GND_57 (plane layer: these items are gaps in the copper):
  region: 20.306,47.186 18.557,48.935 12.624,48.935 11.683,47.994 11.683,43.936 13.101,42.517 18.1,42.517 20.306,44.723
  lines w0.254: 11.683,43.936 13.101,42.517 18.1,42.517 20.306,44.723 20.306,47.186 18.557,48.935 12.624,48.935 11.683,47.994 11.683,43.936
GND_810 (plane layer: these items are gaps in the copper):
  region: 20.313,47.183 18.564,48.932 12.631,48.932 11.69,47.991 11.69,43.932 13.109,42.514 18.107,42.514 20.313,44.72
  lines w0.254: 11.69,43.932 11.69,47.991 12.631,48.932 18.564,48.932 20.313,47.183 20.313,44.72 18.107,42.514 13.109,42.514 11.69,43.932
GND_1012 (plane layer: these items are gaps in the copper):
  region: 20.306,47.186 18.557,48.935 12.624,48.935 11.683,47.994 11.683,43.936 13.101,42.517 18.1,42.517 20.306,44.723
  lines w0.254: 11.683,43.936 11.683,47.994 12.624,48.935 18.557,48.935 20.306,47.186 20.306,44.723 18.1,42.517 13.101,42.517 11.683,43.936
Multi-Layer:
  pour cut-out: 17.628,43.473 17.628,43.715 17.337,43.64

## Silkscreen, mask and mechanical layers (free items; w line width, h text height)
Top Overlay:
  text "3V3CDR" at 11.238,59.493 h0.76 r270
  text "3V3CD" at 32.997,56.829 h0.76
  text "P" at 23.591,56.715 h1.02
  text "N" at 48.141,56.715 h1.02
  text "N" at 20.747,56.641 h1.02
  text "P" at 45.297,56.641 h1.02
  text "PLL IN1" at 19.331,53.787 h1.02
  text "GND" at 6.176,53.751 h0.76
  text "PLL OUT" at 43.878,53.64 h1.02
  text "IN_SEL0" at 13.88,52.238 h0.76
  text "Vcc" at 14.375,50.854 h0.76
  text "SCL" at 11.631,49.941 h0.76 r270
  text "CDR0 LOL" at 36.127,49.342 h0.76 r270
  text "B" at 5.046,49.007 h0.76
  text "3V3APLL" at -3.902,47.232 h0.76
  text "SDA" at 11.635,46.974 h0.76 r270
  text "B" at 6.549,43.52 h0.76
  text "GND" at 11.545,41.726 h0.76
  text "1V8" at 5.173,39.317 h0.76
  text "CDR3 LOL" at 34.773,39.137 h0.76 r270
  text "PLL" at 15.025,38.998 h0.76 r90
  text "Lock" at 16.093,39.006 h0.76 r90
  text "SFP0 <-> GT0" at -4.325,36.568 h1.02
  text "Tx0" at 0.806,32.748 h0.76 r270
  text "Rx0" at 5.068,32.746 h0.76 r270
  text "Fault" at -0.263,32.74 h0.76 r270
  text "LOS" at 4,32.737 h0.76 r270
  text "CDR2 LOL" at 36.184,29.868 h0.76 r270
  text "P2V05" at -1.781,27.197 h0.76
  text "GND" at 16.669,23.657 h0.76
  text "P3V6" at -5.149,23.019 h0.76
  text "*RST" at 26.191,18.687 h0.76
  text "Fault" at -0.289,18.503 h0.76 r270
  text "Tx1" at 0.779,18.511 h0.76 r270
  text "LOS" at 4.001,18.502 h0.76 r270
  text "Rx1" at 5.069,18.511 h0.76 r270
  text "SCL" at 26.923,16.204 h0.76
  text "CDR1 LOL" at 39.596,14.503 h0.76 r270
  text "SDA" at 26.94,13.708 h0.76
  text "SFP1 <-> GT1" at -4.325,12.988 h1.02
  text "CLK40" at 31.387,11.082 h0.76
  text "GBTCLK1" at 7.39,11.046 h1.02
  text "P" at 6.76,8.389 h1.02
  text "N" at 3.916,8.315 h1.02
  text "P12V" at 69.602,7.678 h0.76
  text "VADJ" at 63.637,7.539 h0.76
  text "SLOAD" at 57.731,6.522 h0.76
  text "1VPSF" at 35.43,5.589 h0.76
  text "SFP1Tx En" at 17.387,5.347 h0.76
  text "SFP0Tx En" at 24.973,5.347 h0.76
  text "P3V3" at 69.602,5.165 h0.76
  text "SCL" at 57.731,3.964 h0.76
  text "-" at 10.946,2.227 h1.02 r180
  text "-" at 12.724,2.227 h1.02 r180
  text "+" at 6.628,2.143 h1.02 r180
  text "+" at 8.406,2.143 h1.02 r180
  text "PT100" at 15.65,1.869 h0.76 r270
  text "SDA" at 57.731,1.415 h0.76
  text "SOUT" at 57.731,-1.144 h0.76
Bottom Overlay:
  text "SFP0" at -0.616,43.288 h1.02
  text "SFP1" at -0.925,6.259 h1.02
  text "May 2025" at 34.476,-4.577 h1.02
  text "Rev .Board_Revision" at 23.422,-4.593 h1.02
  text "PSLink_t1" at 46.357,-5.17 h1.02
Top Solder:
  drawing of 38 lines, arcs and shapes, not listed
  text "EP-ESE" at 61.942,1.429 h2.79
  text "CERN" at 67.017,-1.571 h1.38
  text "PSLink" at 36.408,-4.865 h3.81
Bottom Solder:
  lines w0.508: 0,58.8 ccw(c0,59.3) 0.5,59.3 0.5,60.452 cw(c0.948,60.452) 0.948,60.9 10.808,60.9 ; 0,58.8 ccw(c0,58.8) 0,58.8 ; 0,58.8 -5.3,58.8 ccw(c-5.3,58.3) -5.8,58.3 -5.8,-1.7 ccw(c-5.8,-1.7) -5.8,-1.7 ccw(c-5.3,-1.7) -5.3,-2.2 15.6,-2.2 cw(c15.6,-2.7) 16.1,-2.7 16.1,-5 ccw(c16.6,-5) 16.6,-5.5 24.361,-5.5 72.5,-5.5 ccw(c72.5,-5) 73,-5 ; 10.808,60.9 ccw(c10.808,61.392) 11.3,61.392 11.3,63 cw(c11.8,63) 11.8,63.5 72.5,63.5 ; 10.808,60.9 ccw(c10.808,60.9) 10.808,60.9 ; 72.5,63.5 cw(c72.5,63) 73,63 73,-5 ; 72.5,63.5 ccw(c72.5,63.5) 72.5,63.5 ; 73,-5 ccw(c73,-5) 73,-5

## Text inside footprints (layer, text, board x,y; h text height)
ICx1: Dimensions "20mm" at 38.664,13.174 h0.02 r90; Dimensions "15mm" at 38.664,12.674 h0.02 r90; Dimensions "10mm" at 38.664,12.174 h0.02 r90; Dimensions "5mm" at 38.664,11.674 h0.02 r90; Dimensions "1mm" at 38.664,11.274 h0.02 r90; Dimensions "0mm" at 38.664,11.174 h0.02 r90; Dimensions "1mm" at 38.464,11.024 h0.02 r90; Dimensions "5mm" at 38.064,11.024 h0.02 r90; Dimensions "10mm" at 37.564,11.024 h0.02 r90; Dimensions "0mm" at 38.564,11.024 h0.02 r90
U1_l0: Mechanical 13 "*" at 47.168,50.571 h1.27 r270
U1_l1: Mechanical 13 "*" at 47.168,19.861 h1.27 r270
U1_l2: Mechanical 13 "*" at 47.168,30.098 h1.27 r270
U1_l3: Mechanical 13 "*" at 47.168,40.334 h1.27 r270
U6: Mechanical 13 "*" at 50.596,8.55 h1.27 r180